# Altium PCB DELA EPROMMER II.PcbDoc
Units mm, origin at the board's own origin, x right, y up, seen from the top; angles counter-clockwise.
Board outline 69.9 x 99.7 mm, 2 copper layers (Top Layer, Bottom Layer), stack 1.569 mm thick; 42 components, 58 nets, 198 pads, 69 vias.
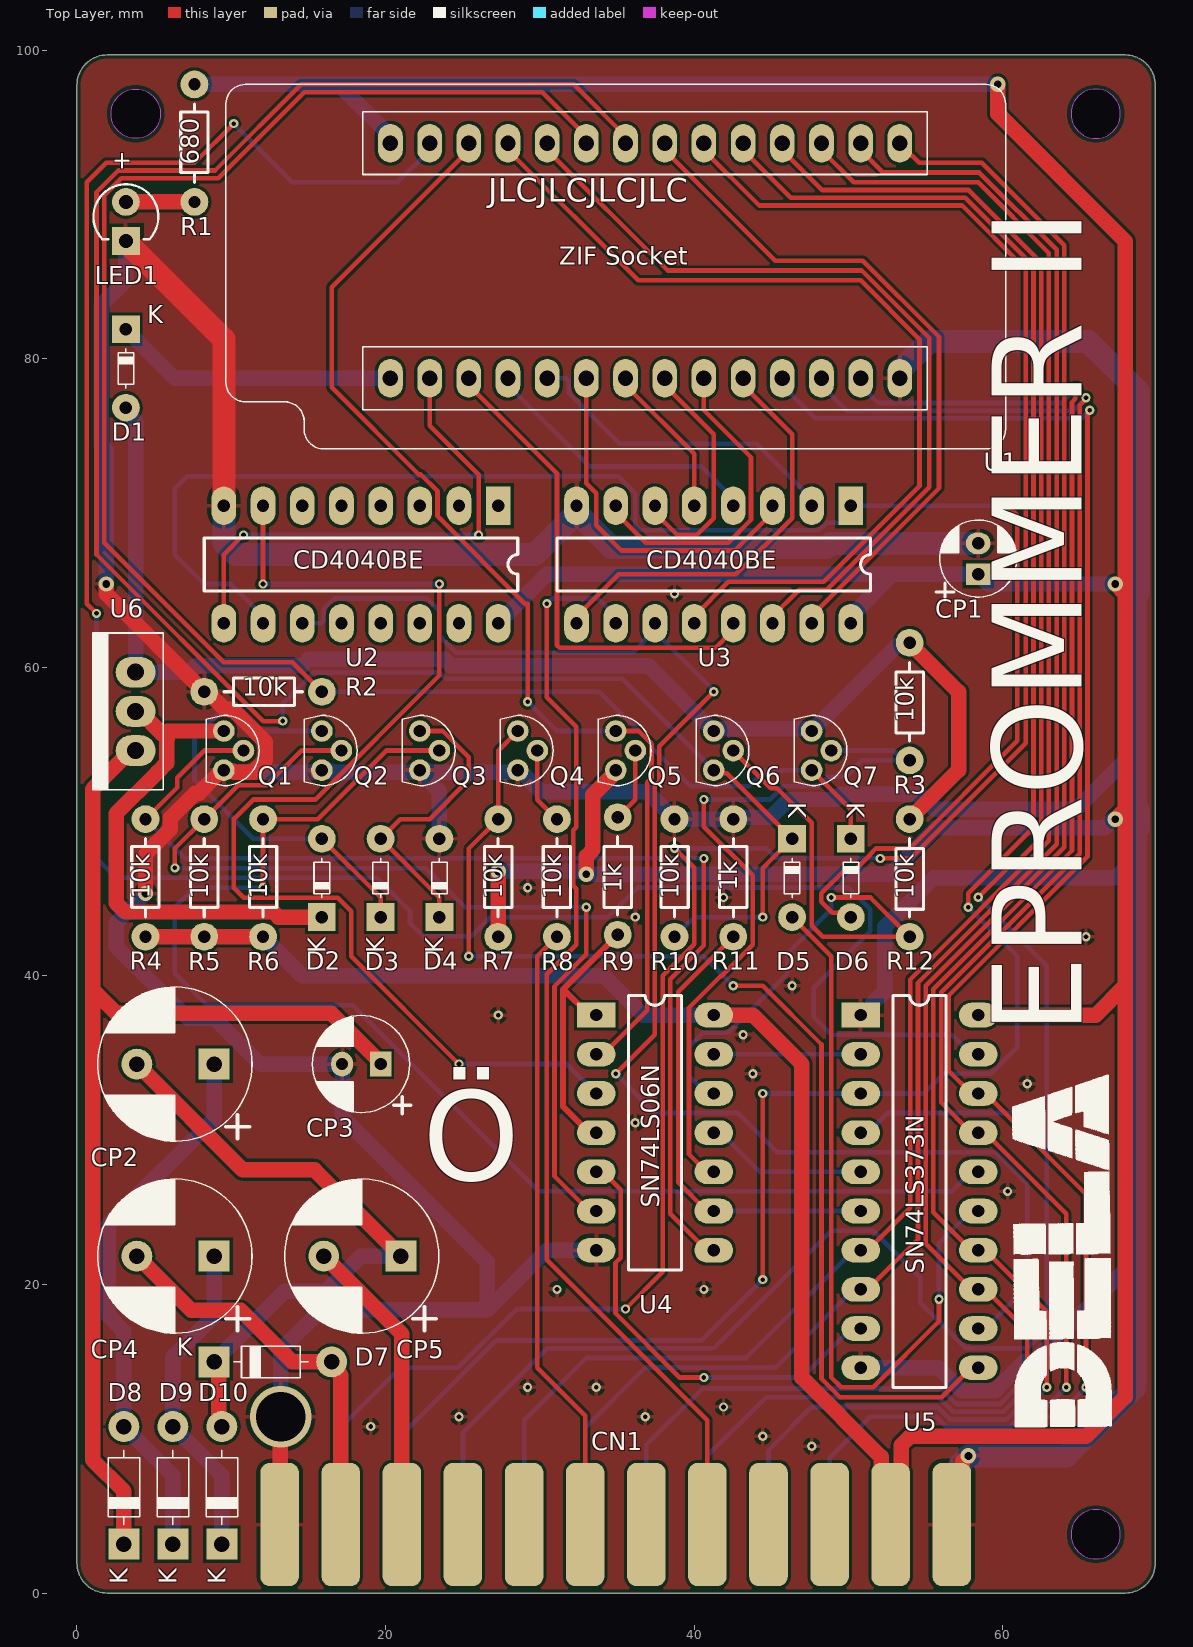
[diagram p0: Top Layer view]
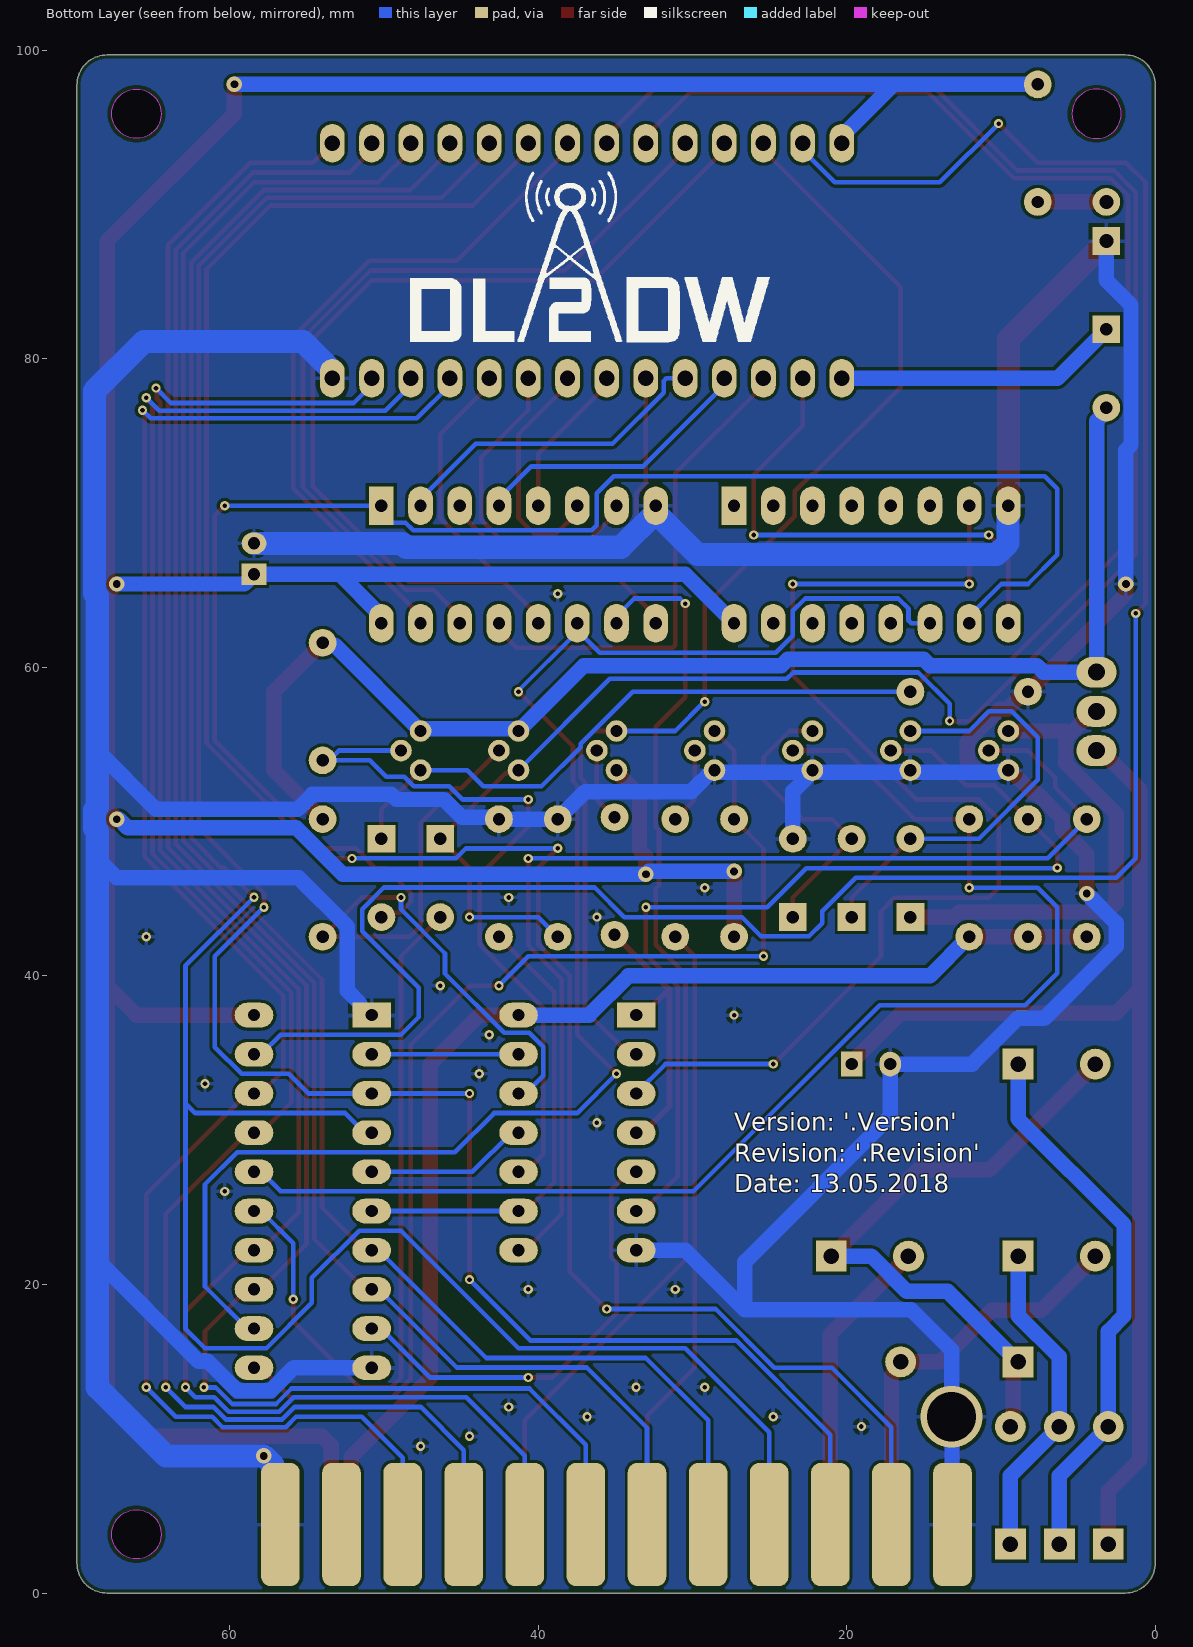
[diagram p1: Bottom Layer view, seen from below]
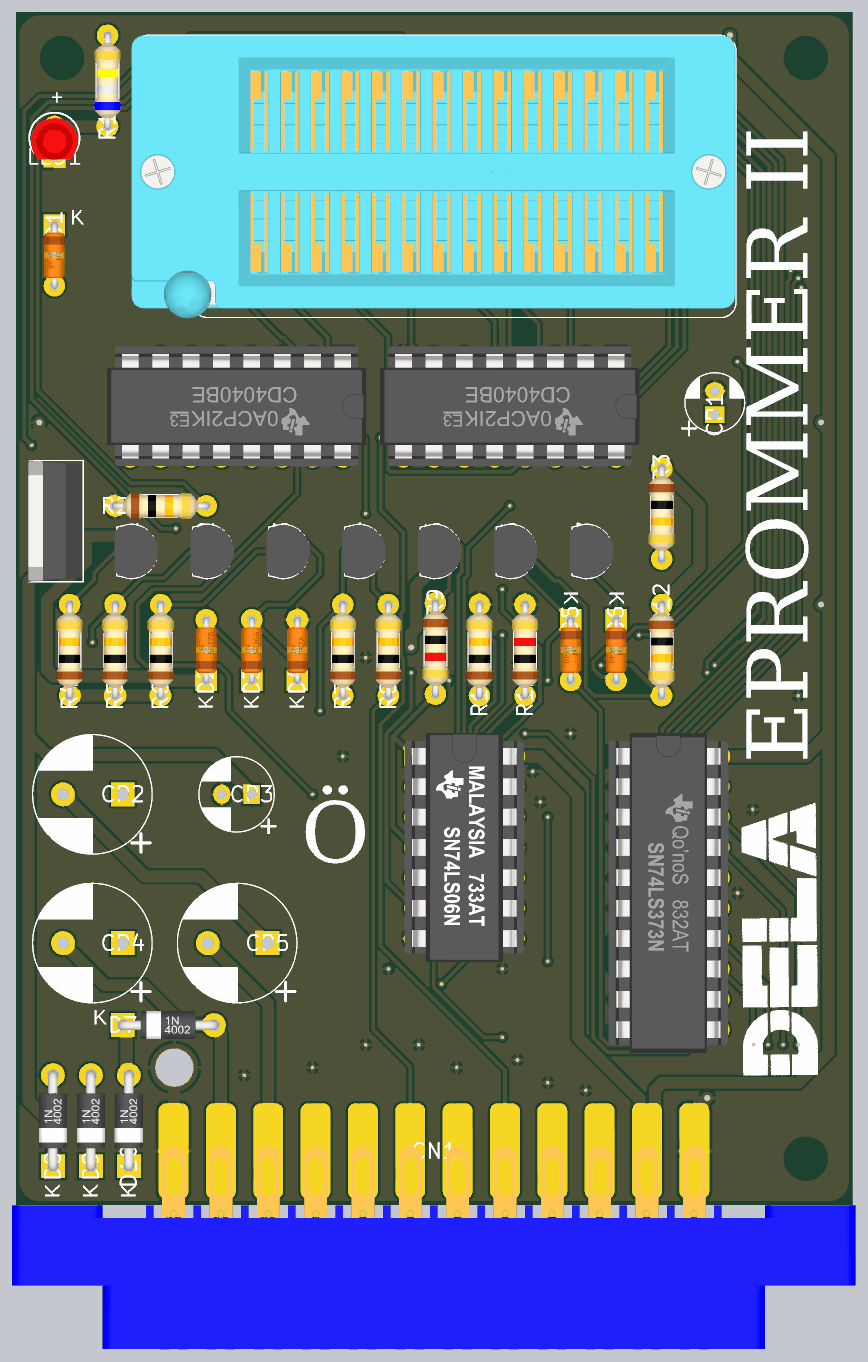
[diagram p2: 3D render of the assembled board from above, using the file's embedded part models]

## Layer stack, top to bottom
Top Solder: solder mask 0.0254, SM-001, Dk 4
Top Layer: signal copper 0.035
Dielectric 1: core 1.4986, Core-043, Dk 4.3
Bottom Layer: signal copper 0.035
Bottom Solder: solder mask 0.0254, SM-001, Dk 4

## Board outline
0,1.956 ccw(c1.956,1.956) 1.956,0 67.945,0 ccw(c67.945,1.955) 69.9,1.955 69.9,97.74 ccw(c67.94,97.74) 67.94,99.7 1.961,99.7 ccw(c1.961,97.739) 0,97.739
cut-out: 3.81,94.285 cw(c3.81,95.885) 2.21,95.885 cw(c3.81,95.885) 3.81,97.485 cw(c3.81,95.885) 5.41,95.885 cw(c3.81,95.885)
cut-out: 64.44,95.885 ccw(c66.04,95.885) 66.04,94.285 ccw(c66.04,95.885) 67.64,95.885 ccw(c66.04,95.885) 66.04,97.485 ccw(c66.04,95.885)
cut-out: 64.44,3.81 ccw(c66.04,3.81) 66.04,2.21 ccw(c66.04,3.81) 67.64,3.81 ccw(c66.04,3.81) 66.04,5.41 ccw(c66.04,3.81)

## Design rules (kind name [scope] priority, off if disabled: settings)
BoardOutlineClearance [All] p1: gap=0.254 ignorepadtopadclearanceinfootprint=FALSE
Clearance [All] p1: gap=0.2 ignorepadtopadclearanceinfootprint=TRUE
ComponentClearance ComponentClearance_Sheet [HasFootprint('PCB Title Block DIN A4')] p1: gap=0 collisioncheckmode=3 verticalgap=0 showdistances=FALSE
ComponentClearance [All] p2: gap=0.254 collisioncheckmode=3 verticalgap=0.254 showdistances=FALSE
HoleSize [All] p1: absolutevalues=TRUE maxlimit=5 minlimit=0.025 maxpercent=80.000 minpercent=20.000
MinimumSolderMaskSliver [All] p1: minsoldermaskwidth=0.103
PolygonConnect [All] p1: connectstyle=Relief reliefconductorwidth=0.254 reliefentries=4 polygonreliefangle="90 Angle" airgapwidth=0.254
RoutingVias RoutingVias_Power [(InNet('VCC') OR InNet('GND') OR InNet('+5V'))] p1: holewidth=0.8 width=1.5 viastyle="Through Hole" minholewidth=0.5 minwidth=1 maxholewidth=0.8 maxwidth=1.5
RoutingVias [All] p2: holewidth=0.5 width=0.8 viastyle="Through Hole" minholewidth=0.3 minwidth=0.6 maxholewidth=0.8 maxwidth=1.2
SilkToSilkClearance [All] p1: silktosilkclearance=0
SilkToSolderMaskClearance [IsPad] p1: minsilkscreentomaskgap=0.1 clearancetoexposedcopper=TRUE
SolderMaskExpansion [All] p1: expansion=0.038 istentingtop=FALSE
UnRoutedNet [All] p1: checkbadconnections=TRUE
Width Width_Power [(InNet('VCC') OR InNet('GND') OR InNet('+5V'))] p1: maxlimit=1.5 minlimit=1 preferedwidth=1.5
Width [All] p2: maxlimit=1 minlimit=0.3 preferedwidth=0.6
24 further rules are at their usual default settings.

## Components (designator, comment, footprint, x,y, rotation, side; value= is the part's Value field where it differs from the comment)
CN1 "Commodore C64 User Port Connector" "C64 User Port Connector" 34.925,4.445 r180 top locked
CP1 "10µF/16V" "CAP Elec 10µF 16V RND 150EHR100M16B" 58.42,66.04 r90 top
CP2 "470µF/50V" "CAP Elec. 470µF 50V Panasonic ECA1HHG471" 8.89,34.29 r180 top
CP3 "100µF/25V" "CAP Elec 100µF 25V Panasonic ECA1EHG101" 19.685,34.29 r180 top
CP4 "470µF/50V" "CAP Elec. 470µF 50V Panasonic ECA1HHG471" 8.89,21.844 r180 top
CP5 "470µF/35V" "CAP Elec 470µF 35V Panasonic ECA1VHG471" 21.002,21.844 r180 top
D1 "1N4148" "1N4148 P=5.08mm" 3.175,81.915 r270 top
D2 "1N5237B" "1N5237B  P=5.08mm" 15.875,43.815 r90 top
D3 "1N5236B" "1N5236B  P=5.08mm" 19.685,43.815 r90 top
D4 "1N752A" "1N752A P=5.08mm" 23.495,43.815 r90 top
D5 "1N4148" "1N4148 P=5.08mm" 46.355,48.895 r270 top
D6 "1N4148" "1N4148 P=5.08mm" 50.165,48.895 r270 top
D7 "1N4002" "1N4002 P=7.62mm" 8.89,14.986 r0 top
D8 "1N4002" "1N4002 P=7.62mm" 3.048,3.175 r90 top
D9 "1N4002" "1N4002 P=7.62mm" 6.223,3.175 r90 top
D10 "1N4002" "1N4002 P=7.62mm" 9.398,3.175 r90 top
LED1 "LED" "LED 3mm Red Straight" 3.175,87.63 r180 top
Q1 "BC237B" BC237 9.525,55.88 r270 top
Q2 "BC237B" BC237 15.875,55.88 r270 top
Q3 "BC237B" BC237 22.225,55.88 r270 top
Q4 "BC237B" BC237 28.575,55.88 r270 top
Q5 "BC558B" BC558B 34.925,55.88 r270 top
Q6 "BC237B" BC237 41.275,55.88 r270 top
Q7 "BC237B" BC237 47.625,55.88 r270 top
R1 "680" "680 kOhm R Axial DIN0207 L6.3mm D2.5mm P7.62mm Horizontal" 7.62,90.17 r90 top
R2 "10k" "10 kOhm R Axial DIN0207 L6.3mm D2.5mm P7.62mm Horizontal" 8.255,58.42 r0 top
R3 "10k" "10 kOhm R Axial DIN0207 L6.3mm D2.5mm P7.62mm Horizontal" 53.975,61.595 r270 top
R4 "10k" "10 kOhm R Axial DIN0207 L6.3mm D2.5mm P7.62mm Horizontal" 4.445,42.545 r90 top
R5 "10k" "10 kOhm R Axial DIN0207 L6.3mm D2.5mm P7.62mm Horizontal" 8.255,42.545 r90 top
R6 "10k" "10 kOhm R Axial DIN0207 L6.3mm D2.5mm P7.62mm Horizontal" 12.065,42.545 r90 top
R7 "10k" "10 kOhm R Axial DIN0207 L6.3mm D2.5mm P7.62mm Horizontal" 27.305,42.545 r90 top
R8 "10k" "10 kOhm R Axial DIN0207 L6.3mm D2.5mm P7.62mm Horizontal" 31.115,42.545 r90 top
R9 "1k" "1,0 kOhm R Axial DIN0207 L6.3mm D2.5mm P7.62mm Horizontal" 35.052,50.292 r270 top
R10 "10k" "10 kOhm R Axial DIN0207 L6.3mm D2.5mm P7.62mm Horizontal" 38.735,42.545 r90 top
R11 "1k" "1,0 kOhm R Axial DIN0207 L6.3mm D2.5mm P7.62mm Horizontal" 42.545,42.545 r90 top
R12 "10k" "10 kOhm R Axial DIN0207 L6.3mm D2.5mm P7.62mm Horizontal" 53.975,50.165 r270 top
U1 "ZIF Socket" "ZIF Socket Textool 28pos P=15.24mm" 20.32,78.74 r90 top
U2 "CD4040BE" "CD4040BE with Socket" 27.305,70.485 r270 top
U3 "CD4040BE" "CD4040BE with Socket" 50.165,70.485 r270 top
U4 "SN74LS06N" "SN74LS06N with Socket" 33.655,37.465 r270 top
U5 "SN74LS373N" "SN74LS373N with Socket" 50.8,37.465 r0 top
U6 "L7805CV" "L 7805 CV" 3.81,54.61 r90 top

## Footprints (in the part's own frame and the unit in brackets; to place one, negate y for a bottom-side part, rotate by r counter-clockwise, add the part's x,y. Pads: shape width x height; smd on the part's side, far side on the other; paste and mask are expansions set on the pad)
"1,0 kOhm R Axial DIN0207 L6.3mm D2.5mm P7.62mm Horizontal" [mm]
  round 1.8 hole 0.8: 1(0,0) 2(7.62,0)
  silkscreen extent 1.27,-0.89 6.35,0.89, body extent -0.27,-1.14 7.9,1.14, height 2.44
"1N752A P=5.08mm" [mm]
  rect 1.8x1.8 hole 0.8: 1(0,0)
  round 1.8 hole 0.8: 2(5.08,0)
  silkscreen extent 1.27,-0.51 3.81,0.51, body extent -0.25,-0.86 5.33,0.86, height 2.02
"1N4002 P=7.62mm" [mm]
  rect 2x2 hole 1: 1(0,0)
  round 2 hole 1: 2(7.62,0)
  silkscreen extent 1.27,-1.02 6.1,1.02, body extent -0.39,-1.18 8.01,1.18, height 2.61
"1N4148 P=5.08mm" [mm]
  rect 1.8x1.8 hole 0.8: 1(0,0)
  round 1.8 hole 0.8: 2(5.08,0)
  silkscreen extent 1.27,-0.51 3.81,0.51, body extent -0.25,-0.86 5.33,0.86, height 2.02
"1N5236B  P=5.08mm" [mm]
  rect 1.8x1.8 hole 0.8: 1(0,0)
  round 1.8 hole 0.8: 2(5.08,0)
  silkscreen extent 1.27,-0.51 3.81,0.51, body extent -0.25,-0.86 5.33,0.86, height 2.02
"1N5237B  P=5.08mm" [mm]
  rect 1.8x1.8 hole 0.8: 1(0,0)
  round 1.8 hole 0.8: 2(5.08,0)
  silkscreen extent 1.27,-0.51 3.81,0.51, body extent -0.25,-0.86 5.33,0.86, height 2.02
"10 kOhm R Axial DIN0207 L6.3mm D2.5mm P7.62mm Horizontal" [mm]
  round 1.8 hole 0.8: 1(0,0) 2(7.62,0)
  silkscreen extent 1.27,-0.89 6.35,0.89, body extent -0.27,-1.14 7.9,1.14, height 2.44
"680 kOhm R Axial DIN0207 L6.3mm D2.5mm P7.62mm Horizontal" [mm]
  round 1.8 hole 0.8: 1(0,0) 2(7.62,0)
  silkscreen extent 1.27,-0.89 6.35,0.89, body extent -0.27,-1.14 7.9,1.14, height 2.44
BC237 [mm] "Amplifier Transistor NPN Silicon"
  round 1.4 hole 0.8: 1(0,0) 2(1.27,1.27) 3(2.54,0)
  silkscreen extent -1.02,-1.14 3.56,2.29, body extent -0.97,-1.34 3.51,2.35, height 7.52
BC558B [mm] "Amplifier Transistor PNP Silicon"
  round 1.4 hole 0.8: 1(0,0) 2(1.27,1.27) 3(2.54,0)
  silkscreen extent -1.02,-1.14 3.56,2.29, body extent -0.97,-1.34 3.51,2.35, height 7.52
"C64 User Port Connector" [mm] "C64 User Port Connector"
  rrect50% 2.5x8 smd paste-1.25: 1(-21.783,0) 2(-17.823,0) 3(-13.863,0) 4(-9.903,0) 5(-5.943,0) 6(-1.983,0) 7(1.983,0) 8(5.943,0) 9(9.903,0) 10(13.863,0) 11(17.823,0) 12(21.783,0)
  rrect50% 2.5x8 smd far side paste-1.25: A(-21.783,0) B(-17.823,0) C(-13.863,0) D(-9.903,0) E(-5.943,0) F(-1.983,0) H(1.977,0) J(5.937,0) K(9.897,0) L(13.857,0) M(17.817,0) N(21.777,0)
  body extent -35.28,-0.4 35.28,16.59, height 4.21
"CAP Elec 10µF 16V RND 150EHR100M16B" [mm] "Elko, radial, 10 µF, 16 V, RM 2,0, 105°C, 2000h, 20%"
  rect 1.4x1.6 hole 0.8: 1(0,0)
  oval 1.4x1.6 hole 0.8: 2(2,0)
  silkscreen extent -1.71,-2.5 3.52,2.73, body extent -1.55,-2.55 3.55,2.55, height 11.2
"CAP Elec 100µF 25V Panasonic ECA1EHG101" [mm] "Elko, radial, 100 µF, 25 V, RM 2,5, 1000h, 105°C, 20%"
  rect 1.4x1.6 hole 0.8: 1(0,0)
  oval 1.4x1.6 hole 0.8: 2(2.5,0)
  silkscreen extent -1.98,-3.15 4.42,3.24, body extent -1.95,-3.2 4.45,3.2, height 11.4
"CAP Elec 470µF 35V Panasonic ECA1VHG471" [mm] "Elko, radial, 470 µF, 50 V, RM 5,0, 1000h, 105°C, 20%"
  rect 2x2 hole 1: 1(0,0)
  round 2 hole 1: 2(5,0)
  silkscreen extent -2.46,-5 7.54,5, body extent -2.55,-5.05 7.55,5.05, height 16.2
"CAP Elec. 470µF 50V Panasonic ECA1HHG471" [mm] "Elko, radial, 470 µF, 50 V, RM 5,0, 1000h, 105°C, 20%"
  rect 2x2 hole 1: 1(0,0)
  round 2 hole 1: 2(5,0)
  silkscreen extent -2.46,-5 7.54,5, body extent -2.55,-5.05 7.55,5.05, height 20.2
"CD4040BE with Socket" [mm] "CMOS 12-Stage Ripple-Carry Binary Counter/Divider"
  rect 2.5x1.6 hole 0.8: 1(0,0)
  oval 2.5x1.6 hole 0.8: 2(0,-2.54) 3(0,-5.08) 4(0,-7.62) 5(0,-10.16) 6(0,-12.7) 7(0,-15.24) 8(0,-17.78) 9(7.62,-17.78) 10(7.62,-15.24) 11(7.62,-12.7) 12(7.62,-10.16) 13(7.62,-7.62) 14(7.62,-5.08) 15(7.62,-2.54) 16(7.62,0)
  silkscreen extent 2.08,-19.05 5.54,1.27, body extent -1.27,-19.75 8.78,1.97, height 8.01
"L 7805 CV" [mm] "Linear Voltage Regulator IC  1 Output  1.5A TO-220AB"
  oval 2x2.6 hole 1.1: 1(0,0) 2(2.54,0) 3(5.08,0)
  silkscreen extent -2.54,-1.78 7.62,2.79, body extent -2.56,-1.65 7.63,2.86, height 19.51
"LED 3mm Red Straight" [mm]
  rect 1.8x1.8 hole 0.9: 1(0,0)
  round 1.8 hole 0.9: 2(0,-2.54)
  silkscreen extent -2.1,-3.68 2.1,-0.13, body extent -2,-3.27 2,0.23, height 6
"SN74LS06N with Socket" [mm]
  rect 1.6x2.5 hole 0.8: 1(0,0)
  oval 1.6x2.5 hole 0.8: 2(2.54,0) 3(5.08,0) 4(7.62,0) 5(10.16,0) 6(12.7,0) 7(15.24,0) 8(15.24,7.62) 9(12.7,7.62) 10(10.16,7.62) 11(7.62,7.62) 12(5.08,7.62) 13(2.54,7.62) 14(0,7.62)
  silkscreen extent -1.27,2.08 16.51,5.54, body extent -1.97,-1.19 17.21,8.86, height 7.91
"SN74LS373N with Socket" [mm] "OCTAL D-TYPE TRANSPARENT LATCHES AND EDGE-TRIGGERED FLIP-FLOPS"
  rect 2.5x1.6 hole 0.8: 1(0,0)
  oval 2.5x1.6 hole 0.8: 2(0,-2.54) 3(0,-5.08) 4(0,-7.62) 5(0,-10.16) 6(0,-12.7) 7(0,-15.24) 8(0,-17.78) 9(0,-20.32) 10(0,-22.86) 11(7.62,-22.86) 12(7.62,-20.32) 13(7.62,-17.78) 14(7.62,-15.24) 15(7.62,-12.7) 16(7.62,-10.16) 17(7.62,-7.62) 18(7.62,-5.08) 19(7.62,-2.54) 20(7.62,0)
  silkscreen extent 2.08,-24.13 5.54,1.27, body extent -1.27,-24.83 8.78,1.97, height 8.01
"ZIF Socket Textool 28pos P=15.24mm" [mm]
  oval 2.5x1.6 hole 1: 1(0,0) 2(0,-2.54) 3(0,-5.08) 4(0,-7.62) 5(0,-10.16) 6(0,-12.7) 7(0,-15.24) 8(0,-17.78) 9(0,-20.32) 10(0,-22.86) 11(0,-25.4) 12(0,-27.94) 13(0,-30.48) 14(0,-33.02) 15(15.24,-33.02) 16(15.24,-30.48) 17(15.24,-27.94) 18(15.24,-25.4) 19(15.24,-22.86) 20(15.24,-20.32) 21(15.24,-17.78) 22(15.24,-15.24) 23(15.24,-12.7) 24(15.24,-10.16) 25(15.24,-7.62) 26(15.24,-5.08) 27(15.24,-2.54) 28(15.24,0)
  silkscreen extent -4.57,-39.88 19.05,10.67, body extent -4.64,-39.8 19.05,10.7, height 23.6

## Part data
CN1: library part CMP-Commodore-00001-1, "Connector for soldering on the board, for connection to the user port of the C64."
CP1: library part CMP-Capacitors-Electrolyt_Capacitors00020-1, "RND 150EHR100M16B - Kondensator, 10µF, 16V, 20%, RND Components"
CP2 CP4: library part CMP-Capacitors-Electrolyt_Capacitors00019-2, "Capacitor 470 uF 50 VDC, ECA1HHG471, Panasonic Automotive & Industrial Systems", Capacitance=470uF, Case/Package=Radial, Leakage Current=3uA, Max Operating Temperature=105°C, Min Operating Temperature=-55°C, Package Quantity=200, Ripple Current=530mA, Tolerance=20%, Voltage=50V, Contact Plating=Tin, Diameter=10mm, Dissipation Factor=0.12%, Height=20mm, Height - Seated (Max)=0.866inch, Lead Diameter=0.6mm, Lead Pitch=5mm, Lead/Base Style=Straight, Length=20mm, Life (Hours)=2000Hour, Mount="Through Hole,PCB", Number of Pins=2, Packaging=Bulk, Radiation Hardening=No, REACH SVHC="No SVHC", Ripple Current (AC)=530mA, Termination=Radial, Voltage Rating=50V, Voltage Rating (DC)=50V
CP3: library part CMP-Capacitors-Electrolyt_Capacitors00022-1, "Capacitor 100 uF 25 VDC, ECA1EHG101, Panasonic Automotive & Industrial Systems", Capacitance=100uF, Case/Package=Radial, Leakage Current=3uA, Max Operating Temperature=105°C, Min Operating Temperature=-55°C, Package Quantity=200, Ripple Current=130mA, Tolerance=20%, Voltage=25V, Diameter=6.3mm, Dissipation Factor=0.16%, Height=11.2mm, Height - Seated (Max)=0.48inch, Lead Diameter=0.5mm, Lead Pitch=2.5mm, Lead/Base Style=Straight, Length=11.2mm, Life (Hours)=1000Hour, Mount="Through Hole,PCB", Number of Pins=2, Packaging=Bulk, Polarity=Polar, Radiation Hardening=No, REACH SVHC="No SVHC", Ripple Current (AC)=130mA, Termination=Radial, Voltage Rating=25V, Voltage Rating (DC)=25V, Width=0inch
CP5: library part CMP-Capacitors-Electrolyt_Capacitors00021-1, "ALUMINUM ELECTROLYTIC CAPACITOR, 470UF, 35V, 20%, RADIAL; Product Range:NHG Series; Capacitance:470 F; Capacitance Tolerance: 20%; Voltage Rating:35V; Diameter:10mm; Capacitor Terminals:Radial Leaded; Packaging:Each; ESR:- ;RoHS Compliant: Yes", Capacitance=470uF, Case/Package=Radial, Dielectric Material=Aluminium, Leakage Current=3uA, Max Operating Temperature=105°C, Min Operating Temperature=-55°C, Package Quantity=200, Ripple Current=460mA, Tolerance=20%, Voltage=35V, Contact Plating=Tin, Diameter=10mm, Dissipation Factor=0.14%, Height=16mm, Height - Seated (Max)=0.669inch, Lead Diameter=0.6mm, Lead Free="Lead Free", Lead Pitch=5mm, Lead/Base Style=Straight, Length=16mm, Life (Hours)=2000Hour, Mount="Through Hole,PCB", Number of Pins=2, Packaging=Bulk, Polarity=Polar, Radiation Hardening=No, REACH SVHC="No SVHC", Termination=Radial, Voltage Rating=35V, Voltage Rating (DC)=35V
D1 D5 D6: library part CMP-Diodes-00002-4, "NEXPERIA - 1N4148 - DIODE, 1N4148 AMMO-BOX 10K", Capacitance=4pF, Case/Package=SOD, Current=4A, Current Rating=200mA, Forward Voltage=1V, Max Operating Temperature=200°C, Max Power Dissipation=500mW, Max Repetitive Reverse Voltage (Vrrm)=100V, Min Operating Temperature=-65°C, Element Configuration=Single, Forward Current=200mA, Height=0.25inch, Lead Free="Lead Free", Length=2.5inch, Max Forward Surge Current (Ifsm)=4A, Number of Pins=2, Output Current=200mA, Packaging="Ammo Pack", Peak Non-Repetitive Surge Current=4A, Polarity=Standard, Radiation Hardening=No, REACH SVHC="No SVHC", Reverse Recovery Time=4ns, Termination=Axial, Voltage=100V, Voltage Rating (DC)=100V, Weight=0.01lb, Width=0.25inch
D2: library part CMP-Diodes-00017-1, "ZENER DIODE, 500mW, 8.2V, DO-35; Zener Voltage Vz Typ:8.2V; Power Dissipation Pd:500mW; Diode Case Style:DO-35; Zener Tolerance :5%; No. of Pins:2Pins; Operating Temperature Max:200 C; Packaging:Each; Breakdown Voltage:8.2V ;RoHS Compliant: Yes", Breakdown Voltage=8.2V, Forward Voltage=1.2V, Max Operating Temperature=200°C, Max Power Dissipation=500mW, Max Reverse Leakage Current=3uA, Min Operating Temperature=-65°C, Package Quantity=1000, Test Current=20mA, Tolerance=5%, Element Configuration=Single, Height=0.5inch, Impedance=8R, Lead Free="Lead Free", Length=0.5inch, Mount="Through Hole", Number of Pins=2, Packaging=Bulk, Peak Reverse Current=3uA, Power Dissipation=500mW, Power Rating=500mW, Radiation Hardening=No, REACH SVHC="No SVHC", Voltage Rating (DC)=8.2V, Voltage Tolerance=5%, Weight=80g, Width=0.5inch, Working Voltage=8.2V, Zener Current=20mA, Zener Voltage=8.2V
D3: library part CMP-Diodes-00016-1, "FAIRCHILD SEMICONDUCTOR         1N5236B             Zener Single Diode, 7.5 V, 500 mW, DO-35, 5 %, 2 Pins, 200 C", Forward Voltage=1.2V, Max Operating Temperature=200°C, Max Power Dissipation=500mW, Max Reverse Leakage Current=3uA, Min Operating Temperature=-65°C, Package Quantity=1000, Test Current=20mA, Tolerance=5%, Voltage Rating (DC)=7.5V, Element Configuration=Single, Height=1.91mm, Impedance=6R, Lead Free="Lead Free", Length=4.56mm, Mount="Through Hole", Number of Pins=2, Packaging=Bulk, Peak Reverse Current=3uA, Power Dissipation=500mW, Power Rating=500mW, Radiation Hardening=No, REACH SVHC="No SVHC", Voltage Tolerance=5%, Weight=0.01lb, Width=1.91mm, Working Voltage=7.5V, Zener Current=20mA, Zener Voltage=7.5V
D4: library part CMP-Diodes-00015-1, "Zener Diode 5.6V 1/2 Watt 5% Do-35 Case", Max Operating Temperature=200°C, Max Power Dissipation=500mW, Zener Voltage=5.6V, Number of Pins=2, REACH SVHC=Unknown
D7 D8 D9 D10: library part CMP-Diodes-00001-2, "DIODE GEN PURP 100V 1A DO41", Average Rectified Current=1A, Capacitance=15pF, Forward Voltage=1.1V, Max Forward Surge Current (Ifsm)=30A, Max Operating Temperature=175°C, Max Repetitive Reverse Voltage (Vrrm)=100V, Min Operating Temperature=-55°C, Package Quantity=1000, Peak Reverse Current=5uA, Power Dissipation=3W, Contact Plating=Tin,Matte, Current Rating=1A, Diameter=2.72mm, Element Configuration=Single, Forward Current=1A, Height=2.72mm, Lead Free="Lead Free", Length=5.2mm, Max Reverse Voltage (DC)=100V, Max Surge Current=30A, Mount="Through Hole", Number of Pins=2, Output Current=1A, Packaging="Tape and Reel", Peak Non-Repetitive Surge Current=30A, Polarity=Standard, Radiation Hardening=No, REACH SVHC="No SVHC", Reverse Voltage=100V, Termination=Axial, Voltage Rating (DC)=100V, Weight=0.245g, Width=2.72mm
LED1: library part CMP-LEDs-00000-1, "WURTH ELEKTRONIK   151033RS03000   LED, 3MM,  RED, 2600MCD, 621NM", Case/Package=Radial, Color=Red, Forward Current=30mA, Forward Voltage=2V, Max Operating Temperature=85°C, Min Operating Temperature=-40°C, Package Quantity=1, Test Current=20mA, Dominant Wavelength=621nm, Height=5.55mm, Lens Size=3mm, Lens Style=Clear,Circular,Round, Luminous Intensity=2600mcd, Mount="Through Hole", Packaging=Bulk, REACH SVHC=Unknown, Viewing Angle=30°, Wavelength=621nm
Q1 Q2 Q3 Q4 Q6 Q7: library part CMP-Transistors-00008-1, "MULTICOMP         BC237B            Bipolar (BJT) Single Transistor, NPN, 45 V, 200 MHz, 350 mW, 100 mA, 290", Case/Package=TO-92, Collector Emitter Breakdown Voltage=45V, Max Operating Temperature=150°C, Max Power Dissipation=350mW, Transition Frequency=200MHz, Collector Emitter Voltage (VCEO)=45V, Number of Pins=3, Polarity=NPN, Power Dissipation=350mW, REACH SVHC="No SVHC"
Q5: library part CMP-Transistors-00007-1, "FAIRCHILD SEMICONDUCTOR         BC558BTA             Bipolar (BJT) Single Transistor, PNP, -30 V, 150 MHz, 500 mW, -100 mA, 200 hFE", Case/Package=TO-92, Collector Base Voltage (VCBO)=-30V, Collector Emitter Breakdown Voltage=30V, Collector Emitter Saturation Voltage=-250mV, Current Rating=-100mA, Emitter Base Voltage (VEBO)=-5V, Frequency=150MHz, Max Collector Current=100mA, Max Frequency=10MHz, Max Operating Temperature=150°C, Max Power Dissipation=500mW, Min Operating Temperature=-65°C, Package Quantity=2000, Collector Emitter Voltage (VCEO)=30V, Contact Plating=Tin,Matte, Element Configuration=Single, Gain Bandwidth Product=150MHz, Height=5.33mm, hFE Min=110, Lead Free="Lead Free", Length=5.2mm, Max Breakdown Voltage=30V, Mount="Through Hole", Number of Elements=1, Number of Pins=3, Packaging="Ammo Pack", Polarity=PNP, Power Dissipation=500mW, REACH SVHC="No SVHC", Transition Frequency=150MHz, Voltage Rating (DC)=-30V, Weight=0.24g, Width=4.19mm
R1: library part CMP-Resistors-Yageo_THT_DIN_0207-00140-1, "Res 680K Ohm 1/4W 5% Axial", Case/Package=Axial, Max Operating Temperature=155°C, Max Power Dissipation=250mW, Min Operating Temperature=-55°C, Package Quantity=200, Resistance=680kR, Temperature Coefficient=-700ppm/°C, Tolerance=5%, Composition="Carbon Film", Length=0.248inch, Number of Terminations=2, Packaging=Bulk
R2 R3 R4 R5 R6 R7 R8 R10 R12: library part CMP-Resistors-Yageo_THT_DIN_0207-00096-1, "RES 10K OHM 1/4W 5% AXIAL", Case/Package=Axial, Max Operating Temperature=155°C, Max Power Dissipation=250mW, Min Operating Temperature=-55°C, Package Quantity=200, Resistance=10kR, Temperature Coefficient=500ppm/°C, Tolerance=5%, Composition="Carbon Film", Lead Free="Lead Free", Length=0.248inch, Number of Terminations=2, Packaging=Bulk
R9 R11: library part CMP-Resistors-Yageo_THT_DIN_0207-00072-1, "RES 1K OHM 1/4W 5% AXIAL", Case/Package=Axial, Max Operating Temperature=155°C, Max Power Dissipation=250mW, Min Operating Temperature=-55°C, Package Quantity=200, Resistance=1kR, Temperature Coefficient=500ppm/°C, Tolerance=5%, Composition="Carbon Film", Lead Free="Lead Free", Length=0.248inch, Number of Terminations=2, Packaging=Bulk, Power Rating=250mW
U1: library part CMP-Mechanicals-00022-1, "CONN IC DIP SOCKET ZIF 28POS GLD", Current Rating=1A, Flammability Rating="UL94 V-0", Max Operating Temperature=150°C, Min Operating Temperature=-55°C, Package Quantity=10, Voltage Rating=1kV, Body Material=Glass,Polysulfone, Contact Material=Copper, Contact Plating=Gold, Depth=11.9mm, Gender=Female, Housing Material=Polysulfone, Lead Free="Lead Free", Length=50.5mm, Mount="Through Hole", Number of Contacts=28, Number of Positions=28, Orientation=Straight, Packaging=Rail/Tube, Pitch=2.54mm, Row Spacing=0.4inch, Termination="Through Hole", Width=17.8mm
U2 U3: library part CMP-ICs-40xx-series-0003-1, "Counter/Divider Single 12-Bit Binary UP 16-Pin PDIP Tube", Case/Package=PDIP, Frequency=24MHz, Input Capacitance=5pF, Max Operating Temperature=125°C, Max Supply Voltage=18V, Min Operating Temperature=-55°C, Min Supply Voltage=3V, Package Quantity=25, Power Dissipation=500mW, Quiescent Current=100uA, Clock Edge Trigger Type="Negative Edge", Contact Plating=Gold, Direction=Unidirectional, Height=4.57mm, Lead Free="Lead Free", Length=19.3mm, Logic Function=Counter, Mount="Through Hole", Number of Bits=12, Number of Bits per Element=12, Number of Elements=1, Number of Pins=16, Packaging=Rail/Tube, Propagation Delay=360ns, Radiation Hardening=No, REACH SVHC="No SVHC", Reset=Asynchronous, Turn-On Delay Time=360ns, Weight=0.03357oz, Width=6.35mm
U4: library part CMP-ICs-74xx-series-00008-2, "IC INVERTER OPEN COL 6CH 14DIP", Case/Package=PDIP, High Level Output Current=-250uA, Low Level Output Current=40mA, Max Operating Temperature=70°C, Max Supply Voltage=5.25V, Min Operating Temperature=0°C, Min Supply Voltage=4.75V, Nominal Supply Current=100uA, Operating Supply Voltage=5V, Package Quantity=25, Height=4.57mm, Lead Free="Lead Free", Length=19.3mm, Logic Function=Buffer,Inverter,Inverting, Mount="Through Hole", Number of Bits=6, Number of Channels=6, Number of Circuits=6, Number of Elements=6, Number of Gates=6, Number of Input Lines=6, Number of Inputs=1, Number of Output Lines=6, Number of Outputs=6, Number of Pins=14, Packaging=Rail/Tube, Polarity=Inverting, Propagation Delay=20ns, Radiation Hardening=No, REACH SVHC="No SVHC", Schmitt Trigger Input=No, Termination="Through Hole", Turn-On Delay Time=20ns, Width=6.35mm
U5: library part CMP-ICs-74xx-series-00062-1, "Latch Transparent 3-ST 8-CH D-Type 20-Pin PDIP Tube", Case/Package=PDIP, High Level Output Current=-2.6mA, Low Level Output Current=24mA, Max Operating Temperature=70°C, Max Supply Voltage=5.25V, Min Operating Temperature=0°C, Min Supply Voltage=4.75V, Operating Supply Current=40mA, Operating Supply Voltage=5V, Package Quantity=20, Contact Plating=Gold, Height=4.57mm, Independent Circuits=1, Lead Free="Lead Free", Length=24.33mm, Logic Function=D-Type,Latch,Flip-Flop, Mount="Through Hole", Number of Bits=8, Number of Channels=8, Number of Circuits=8, Number of Elements=1, Number of Input Lines=3, Number of Output Lines=1, Number of Outputs=8, Number of Pins=20, Output Current=24mA, Packaging=Rail/Tube, Polarity=Non-Inverting, Propagation Delay=18ns, Quiescent Current=24mA, Radiation Hardening=No, REACH SVHC="No SVHC", Turn-On Delay Time=12ns, Weight=0.042297oz, Width=6.35mm
U6: library part CMP-ICs-Power_Supply-00004-8, "STMICROELECTRONICS - L7806CV - LINEAR VOLTAGE REGULATOR 6V TO-220-3", Case/Package=TO, Dropout Voltage=2V, Max Input Voltage=35V, Max Operating Temperature=125°C, Max Output Current=1.5A, Min Input Voltage=8V, Min Operating Temperature=0°C, Min Output Voltage=6V, Package Quantity=50, Power Supply Rejection Ratio (PSRR)=59dB, Quiescent Current=8mA, Tolerance=5%, Contact Plating=Tin,Matte, Height=9.15mm, Lead Free="Lead Free", Length=10.4mm, Mount="Through Hole", Nominal Output Voltage=6V, Number of Outputs=1, Number of Pins=3, Number of Regulators=1, Output Current=1.5A, Output Type=Fixed, Output Voltage=6V, Packaging=Rail/Tube, Polarity=Positive, Radiation Hardening=No, REACH SVHC="No SVHC", Weight=0.08113oz, Width=4.6mm

## Via types
v1: diameter 0.6, hole 0.3, Top Layer to Bottom Layer, tented both sides, 60 vias
v2: diameter 1, hole 0.5, Top Layer to Bottom Layer, tented both sides, 8 vias
v3: diameter 4, hole 3.2, Top Layer to Bottom Layer, tented both sides, 1 vias

## Nets (pads, with @x,y where several pads share a name; then routed paths per layer and width w, separated by ;. In a path a pad name is that pad's centre, name@x,y a point inside that pad or via, vN(x,y) a via of type N, cw(c..) or ccw(c..) an arc to the next point about the centre after c; other vN are vias at no path point)
5V-to-Regulator: CP3.1 D8.1 U6.1 | length 74.3
  Top Layer w1: D8.1 3.048,6.604 1.016,8.636 1.016,39.116 ; U6.1 3.51,54.61 1.016,52.116 1.016,39.116 ; CP3.1 19.685,34.39 16.483,37.592 2.54,37.592 1.016,39.116
9V-AC-1: CN1.10 CP5.2 | length 19.5
  Top Layer w1: CP5.2 21.062,16.784 CN1.10
9V-AC-2: CN1.11 CP4.2 D7.2 | length 26.2
  Top Layer w1: CP4.2 7.415,18.319 10.637,18.319 13.97,14.986 D7.2 16.51,14.715 17.102,14.123 CN1.11
+5V: CN1.2 CP1.1 Q5.3 R1.2 R4.1 R5.1 R6.1 R7.1 U1.28 U2.16 U3.16 U4.14 U5.20 | length 356.7
  Top Layer w1: R4.1 R5.1 R6.1 ; R7.1 v2(27.305,46.775) ; v2(33.02,46.585) 33.02,47.757 33.434,48.171 33.434,51.741 34.925,53.232 Q5.3 ; U4.14 43.815,37.465 46.99,34.29 46.99,13.97 52.129,8.831 52.129,5.064 CN1.2 53.421,5.118 53.421,9.574 54.007,10.16 65.405,10.16 67.945,12.7 67.945,39.37 ; U5.20 66.04,37.465 67.945,39.37 ; v2(59.69,97.79) 59.69,95.885 67.945,87.63 67.945,64.77 ; v2(67.31,50.165) 67.945,50.8 ; v2(67.31,65.405) 67.945,64.77 ; 67.945,39.37 67.945,50.8 ; 67.945,50.8 67.945,64.77
  Bottom Layer w1: R1.2 16.96,97.79 ; R6.1 14.605,40.005 34.155,40.005 36.695,37.465 U4.14 ; U1.28 20.32,94.43 16.96,97.79 ; v2(27.305,46.775) 32.83,46.775 v2(33.02,46.585) 52.658,46.585 55.673,49.6 66.605,49.6 67.17,50.165 v2(67.31,50.165) ; U2.16 27.305,63.153 27.582,63.43 27.87,63.43 30.48,66.04 52.89,66.04 ; U3.16 50.165,63.315 52.89,66.04 ; v2(59.69,97.79) 16.96,97.79 ; v2(67.31,65.405) 59.055,65.405 CP1.1 52.89,66.04
A0: U1.10 U3.9 | length 27.4
  Top Layer w0.3: U3.9 32.385,63.315 35.11,66.04 42.716,66.04 46.355,69.679 46.355,75.115 43.18,78.29 U1.10
A1: U1.9 U3.7 | length 21.1
  Top Layer w0.3: U3.7 34.925,70.035 36.88,68.08 42.216,68.08 43.695,69.559 43.695,71.411 43.691,71.416 43.691,73.631 40.64,76.682 U1.9
A2: U1.8 U3.6 | length 15.7
  Top Layer w0.3: U3.6 37.465,70.035 38.92,68.58 40.176,68.58 41.275,69.679 41.275,75.115 38.1,78.29 U1.8
A3: U1.7 U3.5 | length 10.1
  Top Layer w0.3: U1.7 35.56,78.29 40.005,73.845 U3.5
A4: U1.6 U3.3 | length 23.4
  Top Layer w0.3: U1.6 33.02,71.926 33.655,71.291 33.655,69.215 35.29,67.58 42.63,67.58 45.085,70.035 U3.3
A5: U1.5 U3.2 | length 21.3
  Bottom Layer w0.3: U1.5 31.694,78.74 31.87,78.564 31.87,77.814 35.185,74.499 44.061,74.499 47.625,70.935 U3.2
A6: U1.4 U3.4 | length 18.6
  Bottom Layer w0.3: U1.4 27.94,78.29 33.205,73.025 40.455,73.025 42.545,70.935 U3.4
A7: U1.3 U3.13 | length 32.2
  Top Layer w0.3: U1.3 25.4,78.29 31.115,72.575 31.115,61.441 31.291,61.265 41.395,61.265 42.36,62.23 42.545,62.23 U3.13
A8: U1.25 U3.12 | length 60.3
  Top Layer w0.3: U1.25 27.94,93.53 36.38,85.09 50.8,85.09 54.61,81.28 54.61,71.755 48.395,65.54 42.23,65.54 40.005,63.315 U3.12
A9: U1.24 U3.14 | length 54
  Top Layer w0.3: U1.24 30.48,93.53 38.285,85.725 50.872,85.725 55.245,81.352 55.245,71.683 48.602,65.04 46.81,65.04 45.085,63.315 U3.14
A10: U1.21 U3.15 | length 45.2
  Top Layer w0.3: U1.21 38.1,93.53 45.27,86.36 50.944,86.36 55.88,81.424 55.88,71.611 47.625,63.356 U3.15
A11: D6.1 Q7.3 R2.2 U1.23 | length 116.6
  Top Layer w0.3: R2.2 13.97,60.325 9.525,60.325 1.77,68.08 1.77,90.598 2.882,91.71 9.16,91.71 14.74,97.29 30.16,97.29 33.02,94.43 U1.23 ; Q7.3 50.165,50.8 D6.1
  Bottom Layer w0.3: R2.2 33.87,58.42 37.245,55.045 37.245,54.83 39.785,52.29 43.559,52.29 44.609,53.34 Q7.3
A12: U1.2 U2.9 | length 33
  Top Layer w0.3: U2.9 9.525,67.31 v1(10.795,68.58) ; U1.2 22.86,75.675 26.035,72.5 v1(26.035,68.58)
  Bottom Layer w0.3: v1(10.795,68.58) v1(26.035,68.58)
A13: Q5.1 U1.26 U4.2 | length 76.4
  Top Layer w0.3: U1.26 25.4,93.53 16.51,84.64 16.51,78.165 22.169,72.506 22.281,72.506 23.375,71.411 23.375,69.799 29.039,64.135 29.21,64.135 v1(29.21,57.77) ; U4.2 34.105,34.925 36.965,37.785 36.965,52.554 37.245,52.834 37.245,55.045 37.219,55.071 36.41,55.88 Q5.1
  Bottom Layer w0.3: v1(29.21,57.77) 29.225,57.77 31.115,55.88 Q5.1
C\E\: CN1.M U1.20 | length 141.5
  Top Layer w0.3: v1(35.56,18.415) 37.965,20.82 37.965,40.007 40.005,42.047 40.005,47.005 v1(38.735,48.275) ; U1.20 40.64,93.53 44.23,89.94 57.38,89.94 61.5,85.82 61.5,55.078 54.047,47.625 52.085,47.625 v1(52.07,47.61)
  Bottom Layer w0.3: CN1.M 17.108,10.758 20.955,14.605 24.693,14.605 28.503,18.415 v1(35.56,18.415) ; v1(38.735,48.275) 38.75,48.26 44.695,48.26 45.33,47.625 52.055,47.625 v1(52.07,47.61)
D0: CN1.C U1.11 U5.18 | length 116.2
  Top Layer w0.3: v1(65.405,13.335) 65.405,25.85 58.87,32.385 U5.18 57.97,32.385 56.515,33.84 56.515,38.735 65.5,47.72 65.5,76.439 65.65,76.589 v1(65.65,76.67)
  Bottom Layer w0.3: U1.11 45.72,78.29 47.87,76.14 65.119,76.14 v1(65.65,76.67) ; CN1.C 48.788,8.783 51.435,11.43 55.7,11.43 56.375,10.755 60.465,10.755 61.14,11.43 63.5,11.43 v1(65.405,13.335)
D1: CN1.D U1.12 U5.17 | length 117
  Top Layer w0.3: v1(64.135,13.335) 64.135,24.58 58.87,29.845 U5.17 57.97,29.845 56.015,31.8 56.015,38.942 65,47.927 65,76.984 65.405,77.389 v1(65.405,77.47)
  Bottom Layer w0.3: CN1.D 44.828,9.268 47.625,12.065 55.772,12.065 56.582,11.255 60.258,11.255 61.068,12.065 62.865,12.065 v1(64.135,13.335) ; U1.12 48.26,78.29 49.91,76.64 64.575,76.64 v1(65.405,77.47)
D2: CN1.E U1.13 U5.14 | length 116.5
  Top Layer w0.3: v1(62.865,13.335) 62.865,18.23 58.87,22.225 U5.14 57.97,22.225 55.515,24.68 55.515,39.149 64.5,48.134 64.5,77.191 64.713,77.404 64.713,78.048 v1(64.77,78.105)
  Bottom Layer w0.3: CN1.E 40.868,8.895 44.673,12.7 55.844,12.7 56.789,11.755 60.051,11.755 60.996,12.7 62.23,12.7 v1(62.865,13.335) ; U1.13 50.8,78.29 51.95,77.14 63.805,77.14 v1(64.77,78.105)
D3: CN1.F U1.15 U5.13 | length 126.8
  Top Layer w0.3: U1.15 53.34,93.882 54.051,93.171 54.149,93.171 54.61,92.71 58.658,92.71 64,87.368 64,48.341 55.015,39.356 55.015,22.64 57.97,19.685 58.87,19.685 61.595,16.96 61.595,13.422 v1(61.667,13.35)
  Bottom Layer w0.3: CN1.F 36.908,9.603 40.568,13.263 55.989,13.263 56.997,12.255 59.843,12.255 60.917,13.329 61.646,13.329 v1(61.667,13.35)
D4: CN1.H U1.16 U5.8 | length 116.6
  Top Layer w0.3: U5.8 51.25,19.685 54.515,22.95 54.515,39.563 63.5,48.548 63.5,87.067 58.492,92.075 52.255,92.075 50.8,93.53 U1.16
  Bottom Layer w0.3: CN1.H 32.948,10.723 36.845,14.62 45.285,14.62 50.35,19.685 U5.8
D5: CN1.J U1.17 U5.7 | length 121
  Top Layer w0.3: U1.17 48.26,93.53 50.35,91.44 58.42,91.44 63,86.86 63,48.756 54.015,39.771 54.015,24.99 51.25,22.225 U5.7
  Bottom Layer w0.3: CN1.J 28.988,11.208 33.02,15.24 43.365,15.24 50.35,22.225 U5.7
D6: CN1.K U1.18 U5.4 | length 160.2
  Top Layer w0.3: U1.18 45.72,93.53 48.31,90.94 57.794,90.94 62.5,86.234 62.5,48.963 60.596,47.059 60.384,47.059 v1(58.423,45.097) ; U5.4 U5.4@51.25,29.845
  Bottom Layer w0.3: CN1.K 25.028,10.423 30.48,15.875 41.275,15.875 48.895,23.495 51.606,23.495 54.67,20.431 54.67,18.819 57.614,15.875 61.595,15.875 62.865,17.145 62.865,31.75 ; U5.4 51.25,29.845 52.52,31.115 62.23,31.115 62.865,31.75 ; v1(58.423,45.097) 62.865,40.655 62.865,31.75
D7: CN1.L U1.19 U5.3 | length 139.3
  Top Layer w0.3: U1.19 43.18,93.53 46.27,90.44 57.587,90.44 62,86.027 62,49.594 57.773,45.367 57.773,44.462 v1(57.78,44.455) ; v1(44.45,20.32) v1(44.45,32.385)
  Bottom Layer w0.3: CN1.L 21.068,10.273 27.17,16.375 40.505,16.375 v1(44.45,20.32) ; v1(44.45,32.385) U5.3 54.903,32.385 56.173,33.655 59.226,33.655 60.96,35.389 60.96,41.275 v1(57.78,44.455)
GND: CN1.1 CN1.12 CN1.A CN1.N CP1.2 CP3.2 D4.2 LED1.1 Q1.3 Q2.3 Q3.3 Q4.3 R2.1 R10.2 R11.2 U1.14 U2.8 U3.8 U4.7 U5.1 U5.10 | length 429.9
  Top Layer w1: v2(1.905,65.405) 1.905,64.77 R2.1 8.471,58.42 9.611,57.28 10.105,57.28 12.195,55.19 12.195,53.975 11.43,53.21 10.215,53.21 10.162,53.263 9.602,53.263 Q1.3 9.417,53.34 7.926,51.849 7.677,51.849 6.045,50.218 6.045,49.502 4.445,47.902 v2(4.445,45.345) ; CN1.12 13.175,4.478 v3@13.175,10.287 ; v3@13.208,10.287 v3(13.208,11.43) ; Q2.3@15.637,53.21 15.767,53.34 Q2.3 ; Q3.3@22.225,53.232 Q3.3 ; CN1.1 57.381,5.118 57.381,8.486 v2(57.785,8.89)
  Top Layer w1.5: LED1.1 9.525,81.28 U2.8
  Bottom Layer w1: v2(1.905,65.405) 1.905,74.09 1.575,74.42 1.575,83.49 3.175,85.09 LED1.1 ; v2(4.445,45.345) 2.54,43.44 2.54,41.91 7.2,37.25 8.92,37.25 11.88,34.29 CP3.2 17.185,30.889 26.607,21.468 26.607,18.352 ; Q1.3 9.602,53.263 10.162,53.263 10.215,53.21 15.637,53.21 15.767,53.34 Q2.3 15.952,53.263 16.512,53.263 16.565,53.21 21.987,53.21 22.117,53.34 Q3.3 22.302,53.263 22.862,53.263 22.915,53.21 28.337,53.21 28.467,53.34 Q4.3 28.683,53.34 30.083,51.94 36.96,51.94 R10.2 R11.2 42.655,50.275 44.945,50.275 46.11,51.44 49.196,51.44 49.521,51.765 54.638,51.765 55.603,50.8 64.77,50.8 68.58,54.61 ; CN1.N 13.178,4.475 13.178,11.4 v3(13.208,11.43) 13.208,15.748 15.812,18.352 26.607,18.352 ; Q3.3@22.527,52.929 23.495,51.962 D4.2 ; U4.7 30.48,22.225 26.607,18.352 ; U5.10 55.849,14.605 57.349,13.105 59.491,13.105 61.411,15.025 62.015,15.025 68.58,21.59 ; U5.1 51.25,37.465 51.55,37.765 51.55,38.215 52.375,39.04 52.375,43.208 55.522,46.355 67.31,46.355 68.58,47.625
  Bottom Layer w1.5: U2.8 9.544,70.466 9.544,68.063 10.297,67.31 29.66,67.31 32.385,70.035 U3.8@32.385,70.062 ; U3.8 U3.8@32.385,70.062 ; U1.14 53.34,79.217 55.245,81.122 65.563,81.122 68.76,77.925 68.76,64.804 68.58,64.624 68.58,54.61 68.58,50.946 68.76,50.766 68.76,49.564 68.58,49.384 68.58,47.625 68.58,21.59 68.58,13.335 64.135,8.89 v2(57.785,8.89) 57.208,8.313 57.208,4.945 CN1.A ; CP1.2 48.812,68.04 48.557,67.785 34.635,67.785 32.418,70.002 32.418,70.029 U3.8@32.385,70.062
  other v1: 47.625,9.525 44.45,10.16 19.05,10.795 24.765,11.43 36.83,11.43 41.91,12.065 29.21,13.335 33.655,13.335 31.115,19.685 40.64,19.685 60.325,26.035 36.195,30.48 61.595,33.02 43.815,33.655 43.18,36.195 27.305,37.465 46.355,39.37 65.405,42.545 36.195,43.815 41.91,45.085 29.21,45.72 38.735,64.77
NetCN1_7: CN1.7 R8.1 | length 39.9
  Top Layer w0.3: R8.1 29.845,41.275 29.845,14.605 32.942,11.508 CN1.7
NetCP2_1: CP2.1 D8.2 D9.1 | length 35.7
  Bottom Layer w1: D9.1 6.223,7.62 D8.2 3.048,16.965 2.032,17.981 2.032,23.88 8.89,30.738 CP2.1
NetCP2_2: CP2.2 CP5.1 D7.1 D10.2 | length 41.6
  Top Layer w1: CP2.2 10.748,27.432 15.414,27.432 CP5.1 ; D7.1 9.207,14.669 9.207,10.986 D10.2
  Bottom Layer w1: D7.1 13.456,19.552 16.114,19.552 18.406,21.844 CP5.1
NetCP4_1: CP4.1 D9.2 D10.1 | length 21.1
  Bottom Layer w1: CP4.1 8.89,17.976 6.223,15.309 D9.2 9.398,7.62 D10.1
NetD1_1: D1.1 U1.1 | length 18.5
  Bottom Layer w1: D1.1 6.35,78.74 U1.1
NetD2_1: D2.1 Q1.1 U6.2 | length 32.1
  Top Layer w1: U6.2 4.08,57.15 5.501,55.73 5.85,55.38 5.81,55.34 5.81,53.906 ; 5.81,53.793 5.219,53.201 2.54,50.523 2.54,44.731 3.126,44.145 12.728,44.145 13.058,43.815 D2.1 ; 5.85,55.88 Q1.1
NetD2_2: D2.2 D3.1 Q2.1 | length 28.7
  Top Layer w0.3: D2.2 19.685,45.085 D3.1
  Bottom Layer w0.3: D2.2 11.43,48.895 7.62,52.705 7.62,55.46 9.31,57.15 10.795,57.15 12.065,55.88 Q2.1
NetD3_2: D3.2 D4.1 Q3.1 | length 19.3
  Top Layer w0.3: Q3.1 23.71,55.88 25.4,54.19 25.4,52.705 22.86,50.165 20.955,50.165 D3.2 23.495,45.085 D4.1
NetD5_2: D5.2 U5.15 | length 48.4
  Top Layer w0.3: D5.2 48.895,41.275 48.895,13.974 49.534,13.335 51.606,13.335 55.88,17.609 v1(55.88,19.05)
  Bottom Layer w0.3: v1(55.88,19.05) 55.88,22.675 57.97,24.765 U5.15
NetD6_2: D6.2 U2.10 U3.1 | length 105.2
  Top Layer w0.3: D6.2 49.878,44.102 48.959,44.102 48.245,44.816 48.245,45.354 49.881,46.99 50.555,46.99 51.415,47.85 51.415,47.889 51.786,48.26 53.975,48.26 60.96,55.245 60.96,69.85 v1(60.325,70.485)
  Bottom Layer w0.3: U2.10 12.065,63.315 9.975,65.405 8.255,65.405 6.35,67.31 6.35,71.579 7.161,72.39 35.096,72.39 36.195,71.291 36.195,69.215 36.525,68.885 48.101,68.885 48.601,69.385 49.515,69.385 50.165,70.035 U3.1 v1(60.325,70.485)
NetLED1_2: LED1.2 R1.1 | length 4.4
  Top Layer w1: LED1.2 R1.1
NetQ1_2: Q1.2 R4.2 U4.8 | length 73.5
  Top Layer w0.3: R4.2 6.494,52.214 6.494,52.849 8.255,54.61 Q1.2 ; v1(40.64,47.61) 40.64,41.975 38.465,39.8 38.465,24.585 40.825,22.225 U4.8
  Bottom Layer w0.3: R4.2 6.985,47.625 40.625,47.625 v1(40.64,47.61)
NetQ2_2: Q2.2 R5.2 U4.6 | length 64.3
  Top Layer w0.3: v1(6.35,47.005) 6.35,48.26 R5.2 10.45,52.36 12.287,52.36 14.537,54.61 Q2.2 ; v1(33.02,44.45) 33.02,41.404 30.956,39.34 30.956,27.015 33.205,24.765 U4.6
  Bottom Layer w0.3: v1(6.35,47.005) 6.365,46.99 22.615,46.99 25.155,44.45 v1(33.02,44.45)
NetQ3_2: Q3.2 R6.2 U5.16 | length 86.7
  Top Layer w0.3: v1(12.065,45.72) R6.2 15.612,50.165 20.057,54.61 Q3.2
  Bottom Layer w0.3: v1(12.065,45.72) 7.62,45.72 6.35,44.45 6.35,40.181 8.431,38.1 17.87,38.1 29.935,26.035 56.7,26.035 57.97,27.305 U5.16
NetQ4_1: Q4.1 R7.2 U5.11 | length 74.3
  Top Layer w0.3: v1(25.4,41.275) 25.4,48.26 R7.2 27.305,54.61 Q4.1 ; v1(42.545,39.37) 44.45,39.37 48.26,35.56 48.26,13.902 49.462,12.7 56.065,12.7 57.97,14.605 U5.11
  Bottom Layer w0.3: v1(25.4,41.275) 40.64,41.275 v1(42.545,39.37)
NetQ4_2: Q4.2 R8.2 | length 5
  Top Layer w0.3: Q4.2 29.845,51.435 R8.2
NetQ5_2: Q5.2 R9.1 | length 4.8
  Top Layer w0.3: R9.1 36.195,51.435 Q5.2
NetQ6_2: Q6.2 R12.2 U4.12 | length 44.9
  Top Layer w0.3: Q6.2 44.985,52.17 45.375,52.17 47.625,49.92 47.625,43.252 48.332,42.545 R12.2 51.435,45.085 v1(48.895,45.085)
  Bottom Layer w0.3: U4.12 40.825,32.385 39.675,33.535 39.675,35.401 40.589,36.315 42.201,36.315 46.041,40.154 46.041,41.458 48.895,44.313 v1(48.895,45.085)
NetQ7_2: Q7.2 R3.2 U4.10 | length 47.4
  Top Layer w0.3: v1(40.64,51.435) 40.64,49.68 43.795,46.525 43.795,42.027 41.752,39.984 41.718,39.984 39.675,37.941 39.675,28.455 40.825,27.305 U4.10
  Bottom Layer w0.3: v1(40.64,51.435) 44.903,51.435 45.758,52.29 48.06,52.29 48.69,52.92 49.86,52.92 50.915,53.975 R3.2@53.569,53.975 ; Q7.2 52.934,54.61 R3.2@53.569,53.975 ; R3.2 R3.2@53.569,53.975
NetR9_2: R9.2 U4.1 U4.4 | length 18.3
  Top Layer w0.381: U4.4 33.205,29.845 31.496,31.554 31.496,39.116 ; U4.1 33.205,37.465 31.554,39.116 31.496,39.116 ; R9.2 31.496,39.116
NetR11_1: R11.1 U4.9 U5.6 | length 30
  Top Layer w0.3: U4.9 40.825,24.765 38.965,26.625 38.965,38.965 R11.1
  Bottom Layer w0.3: U4.9 U5.6
NetU2_7: U2.7 U4.3 | length 74.8
  Top Layer w0.3: v1(12.065,65.405) U2.7 ; v1(23.495,65.405) 23.495,59.475 15.455,51.435 11.43,51.435 10.16,50.165 10.16,45.72 10.81,45.07 16.915,45.07 17.78,44.205 17.78,41.275 v1(24.765,34.29)
  Bottom Layer w0.3: v1(12.065,65.405) v1(23.495,65.405) ; v1(24.765,34.29) 31.75,34.29 U4.3
NetU4_5: U4.5 U5.9 | length 29.2
  Top Layer w0.3: U4.5 34.105,27.305 35.255,26.155 35.255,21.749 34.91,21.404 34.91,18.146 39.086,13.97 v1(40.64,13.97)
  Bottom Layer w0.3: v1(40.64,13.97) 46.99,13.97 50.165,17.145 U5.9
NetU4_11: U4.11 U5.5 | length 10.6
  Bottom Layer w0.3: U4.11 41.725,29.845 44.265,27.305 U5.5
NetU4_13: U4.13 U5.2 | length 9.5
  Bottom Layer w0.3: U4.13 U5.2
O\E\: D5.1 Q6.3 R10.1 U1.22 | length 130.6
  Top Layer w0.3: v1(13.335,56.53) 13.32,56.515 12.072,56.515 1.27,67.317 1.27,90.805 2.675,92.21 8.953,92.21 14.533,97.79 32.2,97.79 35.56,94.43 U1.22 ; Q6.3 41.485,53.13 42.12,53.13 D5.1 45.085,47.625 44.45,46.99 v1(44.45,43.815)
  Bottom Layer w0.3: v1(13.335,56.53) 13.335,57.648 15.357,59.67 23.479,59.67 23.889,59.26 35.355,59.26 Q6.3 ; R10.1 40.005,43.815 v1(44.45,43.815)
P\G\M\: U1.27 U5.19 | length 145.6
  Top Layer w0.3: v1(1.27,63.5) 0.635,64.135 0.635,91.44 1.905,92.71 7.62,92.71 v1(10.16,95.25)
  Bottom Layer w0.3: v1(1.27,63.5) 1.27,47.625 2.54,46.355 7.43,46.355 7.445,46.37 19.425,46.37 21.588,44.207 21.588,43.428 22.45,42.565 25.557,42.565 26.792,43.8 34.412,43.8 36.347,45.735 50.013,45.735 51.415,44.333 51.415,42.911 47.749,39.246 47.749,37.341 48.895,36.195 56.7,36.195 57.97,34.925 U5.19 ; v1(10.16,95.25) 13.97,91.44 20.77,91.44 22.86,93.53 U1.27
RES: U2.11 U3.11 U5.12 | length 101
  Top Layer w0.3: v1(34.925,33.655) 37.465,36.195 37.465,52.347 37.745,52.627 37.745,54.89 v1(41.275,58.42)
  Bottom Layer w0.3: U2.11 15.819,62.865 15.995,63.041 15.995,63.791 16.669,64.465 22.701,64.465 23.495,63.671 23.495,62.059 24.594,60.96 36.019,60.96 U3.11@37.465,62.406 ; v1(34.925,33.655) 37.465,31.115 42.863,31.115 45.403,28.575 59.514,28.575 61.595,26.494 61.595,19.87 58.87,17.145 U5.12 ; U3.11 U3.11@37.465,62.406 ; v1(41.275,58.42) 41.275,58.501 37.546,62.23 37.465,62.23 U3.11@37.465,62.406
SP1: CN1.5 U3.10 | length 71.3
  Top Layer w0.3: v1(30.465,64.135) 30.465,58.069 32.37,56.164 32.37,49.652 32.17,49.452 32.17,45.842 32.37,45.642 32.37,42.032 30.456,40.118 30.456,21.614 40.868,11.202 CN1.5
  Bottom Layer w0.3: v1(30.465,64.135) 30.48,64.15 30.495,64.15 30.81,64.465 33.775,64.465 34.925,63.315 U3.10
VPP: D1.2 Q6.1 Q7.1 R3.1 R12.1 U6.3 | length 86.4
  Top Layer w1: R12.1 57.15,53.34 57.15,58.42 R3.1
  Bottom Layer w1: D1.2 3.175,76.619 3.81,75.984 U6.3 7.262,59.69 7.682,60.11 14.595,60.11 15.005,60.52 23.832,60.52 24.242,60.11 37.045,60.11 Q6.1 41.383,55.88 41.513,56.01 47.212,56.01 47.266,55.957 47.548,55.957 Q7.1 53.187,61.442 53.822,61.442 R3.1
pads on no net: CN1.3 CN1.4 CN1.6 CN1.8 CN1.9 CN1.B U2.1 U2.2 U2.3 U2.4 U2.5 U2.6 U2.12 U2.13 U2.14 U2.15

## Polygon pours and split planes (outlines as drawn)
GND on Bottom Layer "Bottom Layer - GND" (solid, remove dead copper, pour order 0): 0,1.956 ccw(c1.956,1.956) 1.956,0 67.945,0 ccw(c67.945,1.955) 69.9,1.955 69.9,97.74 ccw(c67.94,97.74) 67.94,99.7 1.961,99.7 ccw(c1.961,97.739) 0,97.739
GND on Top Layer "Top Layer - GND" (solid, remove dead copper, pour order 1): 0,1.956 ccw(c1.956,1.956) 1.956,0 67.945,0 ccw(c67.945,1.955) 69.9,1.955 69.9,97.74 ccw(c67.94,97.74) 67.94,99.7 1.961,99.7 ccw(c1.961,97.739) 0,97.739

## Silkscreen, mask and mechanical layers (free items; w line width, h text height)
Top Overlay:
  drawing of 14 lines, arcs and shapes, not listed
  text "JLCJLCJLCJLC" at 26.67,90.17 h1.52
  text "EPROMMER II" at 67.051,36.209 h10 r90
  text "Ö" at 22.401,24.862 h10
Bottom Overlay:
  drawing of 12 lines, arcs and shapes, not listed
  text "Version: '.Version' / Revision: '.Revision' / Date: 13.05.2018" at 27.305,25.585 h2
Board:
  circle w0.1: c3.81,95.885 r1.6
  circle w0.1: c66.04,95.885 r1.6
  circle w0.1: c66.04,3.81 r1.6
  lines w0.1: 0,1.956 ccw(c1.956,1.956) 1.956,0 67.945,0 ccw(c67.945,1.955) 69.9,1.955 69.9,97.74 ccw(c67.94,97.74) 67.94,99.7 1.961,99.7 ccw(c1.961,97.739) 0,97.739 0,1.956

## Text inside footprints (layer, text, board x,y; h text height)
D1: Top Overlay "K" at 4.551,81.91 h2; Top Assembly "K" at 4.551,81.91 h2
D2: Top Overlay "K" at 16.515,41.46 h2 r90; Top Assembly "K" at 16.515,41.46 h2 r90
D3: Top Overlay "K" at 20.325,41.46 h2 r90; Top Assembly "K" at 20.325,41.46 h2 r90
D4: Top Overlay "K" at 24.135,41.46 h2 r90; Top Assembly "K" at 24.135,41.46 h2 r90
D5: Top Overlay "K" at 45.715,51.25 h2 r270; Top Assembly "K" at 45.715,51.25 h2 r270
D6: Top Overlay "K" at 49.525,51.25 h2 r270; Top Assembly "K" at 49.525,51.25 h2 r270
D7: Top Overlay "K" at 6.456,14.981 h2; Top Assembly "K" at 6.456,14.981 h2
D8: Top Overlay "K" at 3.688,0.566 h2 r90; Top Assembly "K" at 3.688,0.566 h2 r90
D9: Top Overlay "K" at 6.863,0.566 h2 r90; Top Assembly "K" at 6.863,0.566 h2 r90
D10: Top Overlay "K" at 10.038,0.566 h2 r90; Top Assembly "K" at 10.038,0.566 h2 r90
LED1: Top Overlay "+" at 3.818,92.167 h2 r90; Top Assembly "+" at 3.818,92.167 h2 r90